# Altium PCB MezzanineDCDC_R1_test.PcbDoc (part 2 of 2)
Units mm, origin at the board's own origin, x right, y up, seen from the top; angles counter-clockwise.
Board outline 70 x 70 mm, 4 copper layers (Top Layer, GND 1, Signal, Bottom Layer), stack 1.554 mm thick; 95 components, 53 nets, 436 pads, 382 vias.
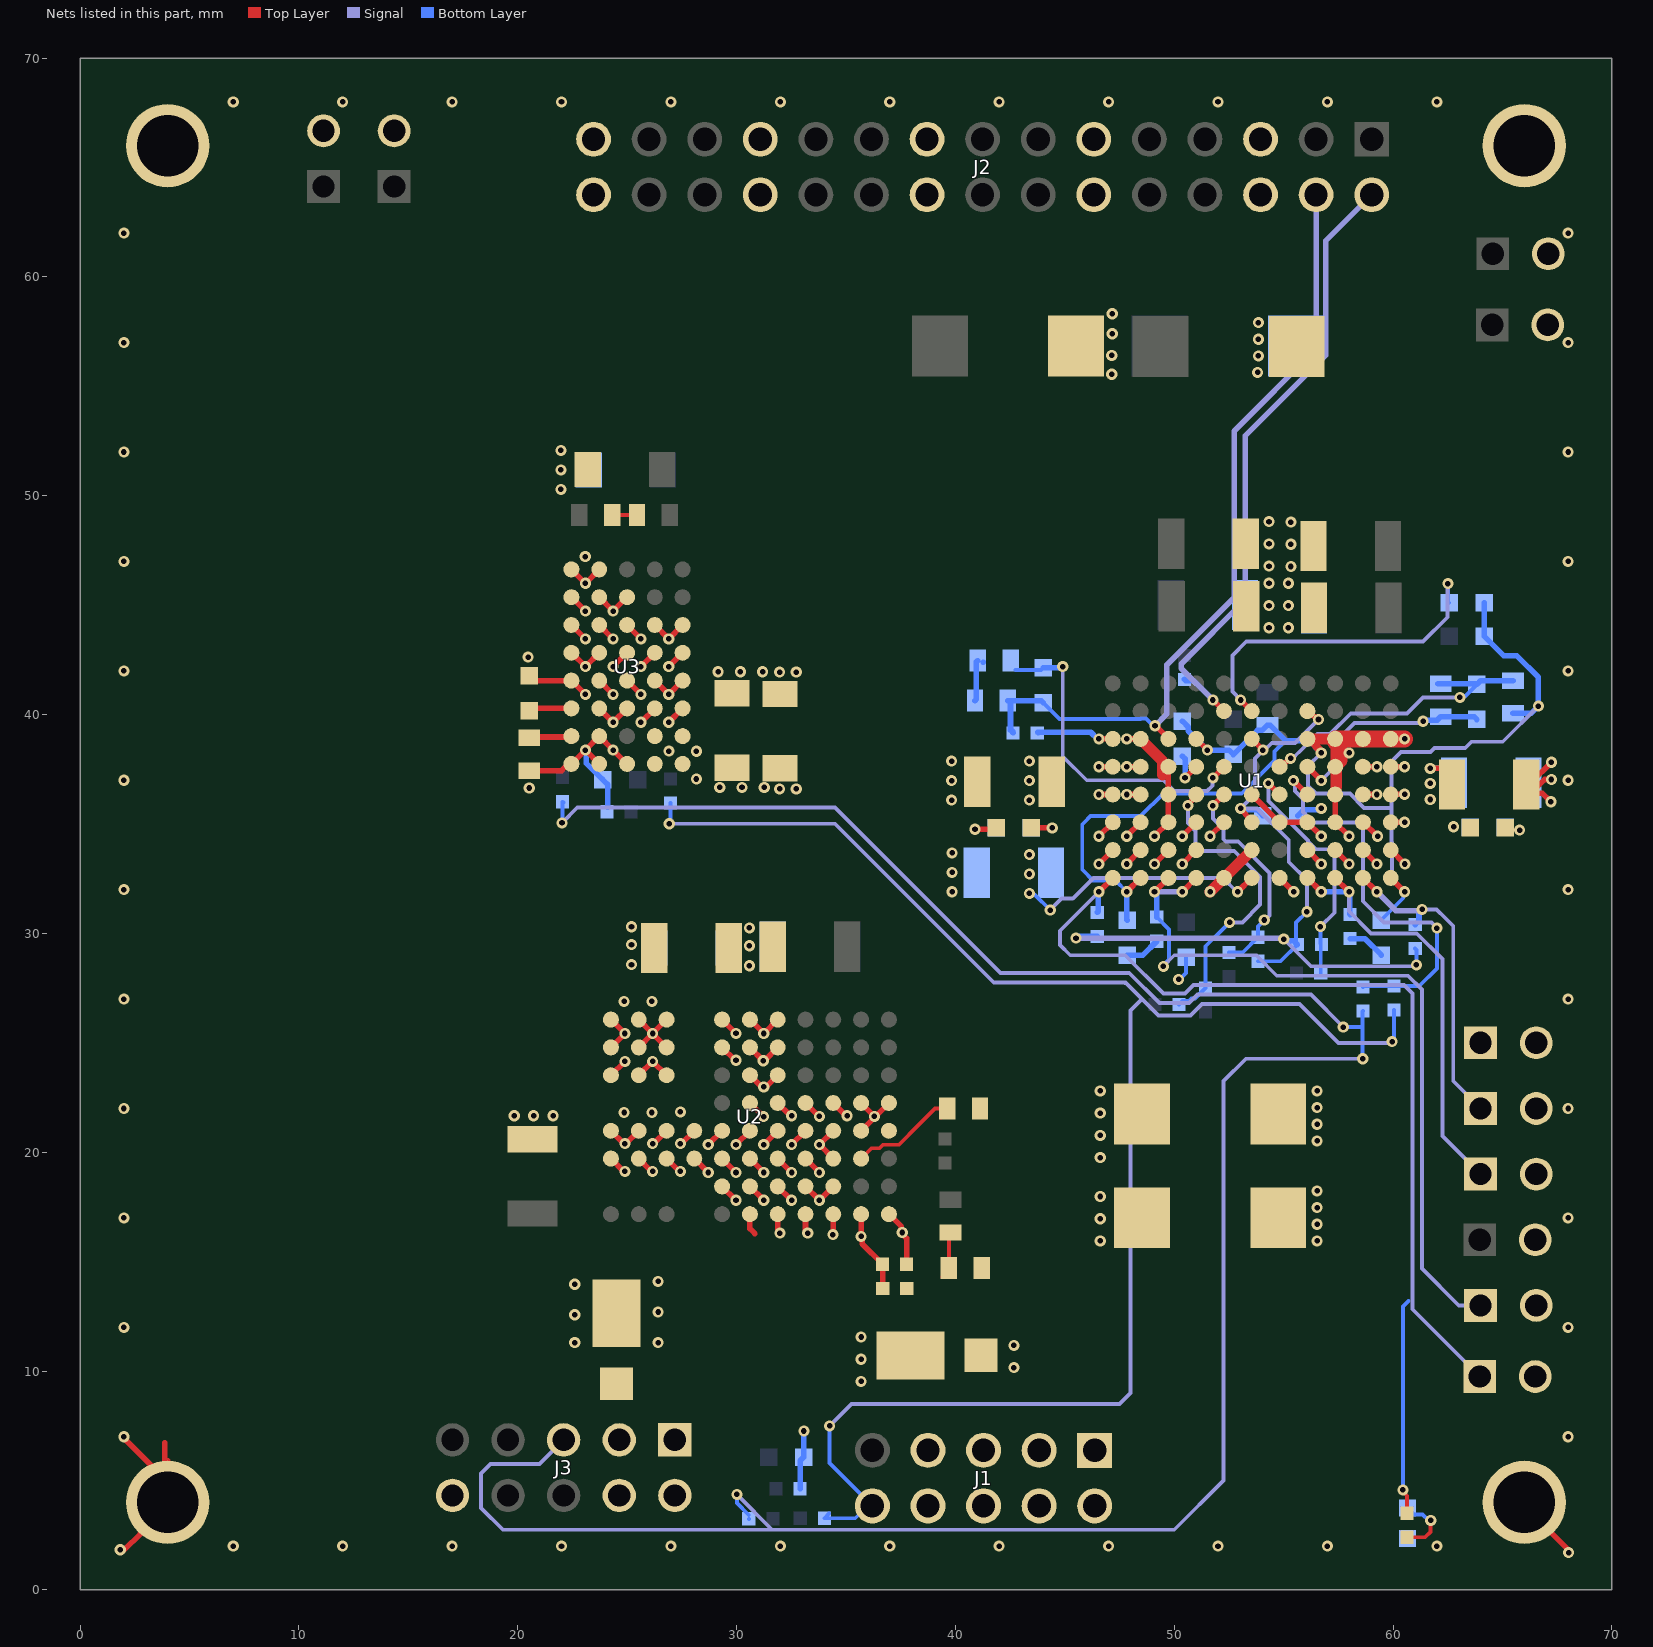
[diagram p3: the nets of this part, all layers, seen from the top]

## Via types
v1: diameter 0.508, hole 0.254, Top Layer to Bottom Layer, tented both sides, 382 vias

## Nets (pads, with @x,y where several pads share a name; then routed paths per layer and width w, separated by ;. In a path a pad name is that pad's centre, name@x,y a point inside that pad or via, vN(x,y) a via of type N, cw(c..) or ccw(c..) an arc to the next point about the centre after c; other vN are vias at no path point) (continued)
GND: C1.2 C2.2 C3.2 C4.2 C5.2 C6.2 C7.2 C8.2 C9.2 C14.2 C15.2 C20.2 C21.2 C22.2 C23.2 C24.2 C25.2 C26.2 C27.2 C28.2 C29.2 C30.2 C31.2 C32.2 C33.2 C34.2 C35.2 C36.2 C37.2 C38.2 C39.2 C40.2 C41.2 H1.2 H2.2 H3.2 H4.2 H5.2 H6.2 H7.2 H8.2 H9.2 H10.2 J1.01 J1.02 J1.07 J1.08 J2.5 J2.6 J2.11 J2.12 J2.17 J2.18 J2.23 J2.24 J2.29 J2.30 J3.1 J3.6 J3.10 L1.2 pad.1 pad.2 pad.3 pad.4 R20.1 R25.1 R26.1 R28.1 R30.1 R34.1 R35.1 U1.A3 U1.A6 U1.A7 U1.B3 U1.B6 U1.B7 U1.C3 U1.C4 U1.C5 U1.C6 U1.C7 U1.D6 U1.D7 U1.E6 U1.E8 U1.F5 U1.F7 U1.G6 U1.G8 U1.H6 U1.H7 U1.J4 U1.J5 U1.J6 U1.J7 U1.K3 U1.K6 U1.K7 U1.L3 U1.L6 U1.L7 U2.A4 U2.A5 U2.A8 U2.B4 U2.B5 U2.C4 U2.C5 U2.C6 U2.C7 U2.C8 U2.D4 U2.D5 U2.D6 U2.D7 U2.D8 U2.E1 U2.E2 U2.E3 U2.E4 U2.E5 U2.E6 U2.E7 U2.E8 U2.F1 U2.F2 U2.F3 U2.F4 U2.F5 U2.F6 U2.F7 U2.F8 U2.G1 U2.G2 U2.G5 U2.G6 U2.G7 U2.H5 U2.H6 U2.J5 U2.J6 U2.K5 U2.K6 U2.L5 U2.L6 U3.A1 U3.A2 U3.B1 U3.B2 U3.B3 U3.C1 U3.C2 U3.C3 U3.C4 U3.C5 U3.D1 U3.D2 U3.D3 U3.D4 U3.D5 U3.E1 U3.E2 U3.E3 U3.E4 U3.E5 U3.F2 U3.F3 U3.F4 U3.F5 U3.G2 U3.H1 U3.H2 U3.H3 | length 138.9
  Top Layer w0.254: v1(1.837,1.837) 2.028,1.837 2.752,2.561 ; v1(2,7) 2,6.931 pad.1@3.869,5.063 ; 3.869,6.731 pad.1@3.869,5.063 ; 4,5.905 pad.1@4,4.453 ; R35.1@20.523,37.44 22.004,37.44 22.309,37.744 U3.H1@22.454,37.744 v1(23.089,38.379) ; C38.2@20.523,41.783 20.752,41.554 U3.E1@22.454,41.554 v1(23.089,40.919) ; U3.D1@22.454,42.824 v1(23.089,42.189) U3.D2@23.724,42.824 ; U3.C1@22.454,44.094 v1(23.089,43.459) ; U3.B1@22.454,45.364 v1(23.089,44.729) ; U3.A1@22.454,46.634 v1(23.089,45.999) U3.A2@23.724,46.634 ; U3.H2@23.724,37.744 v1(23.089,38.379) ; U3.F2@23.724,40.284 v1(24.359,39.649) U3.F3@24.994,40.284 ; U3.E2@23.724,41.554 v1(24.359,40.919) ; U3.C2@23.724,44.094 v1(24.359,43.459) ; U3.B2@23.724,45.364 v1(24.359,44.729) U3.B3@24.994,45.364 ; U2.L6@24.259,19.71 24.843,19.126 v1(24.894,19.126) ; U2.L5@24.259,20.98 24.843,20.396 v1(24.894,20.396) 24.944,20.396 U2.K5@25.529,20.98 ; v1(24.359,42.189) U3.D3@24.994,42.824 ; U3.H3@24.994,37.744 v1(24.359,38.379) U3.G2@23.724,39.014 v1(23.089,38.379) ; U3.E3@24.994,41.554 v1(25.629,40.919) ; U3.C3@24.994,44.094 v1(25.629,43.459) ; U2.K6@25.529,19.71 26.113,19.126 v1(26.164,19.126) ; v1(25.629,39.649) U3.F4@26.264,40.284 ; v1(25.629,42.189) U3.D4@26.264,42.824 ; v1(26.164,20.396) 26.214,20.396 U2.J5@26.799,20.98 ; U3.E4@26.264,41.554 v1(26.899,40.919) U3.E5@27.534,41.554 ; U3.C4@26.264,44.094 v1(26.899,43.459) U3.C5@27.534,44.094 ; U2.J6@26.799,19.71 27.383,19.126 v1(27.434,19.126) ; v1(26.899,39.649) U3.F5@27.534,40.284 ; v1(26.899,42.189) U3.D5@27.534,42.824 ; v1(27.434,20.396) 27.484,20.396 U2.H5@28.069,20.98 ; U2.H6@28.069,19.71 v1(28.704,19.075) ; v1(28.704,20.345) U2.G5@29.339,20.98 ; U2.G7@29.339,18.44 v1(29.974,17.805) ; U2.G6@29.339,19.71 v1(29.974,19.075) ; U2.G2@29.339,24.79 29.923,24.206 v1(29.974,24.206) ; U2.G1@29.339,26.06 29.969,25.43 v1(29.974,25.43) ; v1(29.974,20.345) U2.F5@30.609,20.98 ; U2.F8@30.609,17.17 30.609,16.51 30.837,16.281 ; U2.F7@30.609,18.44 v1(31.244,17.805) ; U2.F6@30.609,19.71 v1(31.244,19.075) ; U2.F4@30.609,22.25 31.23,21.629 v1(31.233,21.629) ; U2.F3@30.609,23.52 31.103,23.026 31.384,23.026 U2.E3@31.879,23.52 ; U2.F2@30.609,24.79 v1(31.218,24.181) 31.269,24.181 U2.E2@31.879,24.79 ; U2.F1@30.609,26.06 v1(31.244,25.425) U2.E1@31.879,26.06 ; v1(31.244,20.345) U2.E5@31.879,20.98 ; U2.E8@31.879,17.17 31.879,16.463 31.98,16.362 v1(31.98,16.307) ; U2.E7@31.879,18.44 v1(32.514,17.805) ; U2.E6@31.879,19.71 v1(32.514,19.075) ; U2.E4@31.879,22.25 32.463,21.666 v1(32.514,21.666) ; v1(32.514,20.345) U2.D5@33.149,20.98 ; U2.D8@33.149,17.17 33.149,16.463 33.25,16.362 v1(33.25,16.307) ; U2.D7@33.149,18.44 v1(33.784,17.805) U2.C7@34.419,18.44 ; U2.D6@33.149,19.71 v1(33.784,19.075) ; U2.D4@33.149,22.25 33.758,21.641 v1(33.784,21.641) ; v1(34.403,16.236) 34.411,16.244 34.411,17.163 U2.C8@34.419,17.17 ; U2.C6@34.419,19.71 v1(33.784,20.345) U2.C5@34.419,20.98 ; U2.C4@34.419,22.25 35.003,21.666 v1(35.054,21.666) ; U2.B5@35.689,20.98 36.298,21.59 v1(36.298,21.641) ; U2.B4@35.689,22.25 v1(36.298,21.641) ; U2.A8@36.959,17.17 37.529,16.6 37.529,16.371 v1(37.568,16.332) 37.568,16.263 37.77,16.062 R30.1@37.77,14.884 ; U2.A4@36.959,22.25 36.349,21.641 v1(36.298,21.641) ; v1(40.894,34.76) 41.796,34.76 C8.2@41.859,34.823 ; v1(46.558,33.172) U1.L7@47.193,33.807 ; v1(46.558,34.442) U1.L6@47.193,35.077 ; v1(46.558,38.887) U1.L3@47.193,38.887 ; v1(47.828,33.172) U1.K7@48.463,33.807 ; v1(47.828,34.442) U1.K6@48.463,35.077 ; v1(47.828,38.887) U1.K3@48.463,38.887 ; v1(49.098,33.172) U1.J7@49.733,33.807 ; v1(49.098,34.442) U1.J6@49.733,35.077 U1.J5@49.733,36.347 49.733,37.236 ; v1(50.368,33.172) U1.H7@51.003,33.807 ; v1(50.368,34.442) U1.H6@51.003,35.077 ; v1(51.638,34.442) U1.G6@52.273,35.077 ; U1.F5@53.543,36.347 U1.E6@54.813,35.077 U1.D6@56.083,35.077 v1(56.718,34.442) ; U1.E8@54.813,32.537 54.82,32.537 55.455,31.902 v1(55.461,31.902) ; U1.D7@56.083,33.807 v1(56.718,33.172) ; U1.C7@57.353,33.807 v1(57.988,33.172) ; U1.C5@57.353,36.347 U1.C6@57.353,35.077 v1(57.988,34.442) ; U1.C4@57.571,37.836 v1(57.988,38.252) ; U1.B7@58.623,33.807 v1(59.258,33.172) ; U1.B6@58.623,35.077 58.642,35.077 59.277,34.442 v1(59.296,34.442) ; U1.A7@59.893,33.807 59.9,33.807 60.535,33.172 v1(60.541,33.172) ; U1.A6@59.893,35.077 v1(60.528,35.077) ; pad.4@65.655,4.195 68.019,1.831 v1(68.019,1.702) ; v1(67.208,36.017) 66.815,36.411 C2.2@66.307,36.411 ; v1(67.234,37.033) 66.929,37.033 C2.2@66.307,36.411 ; v1(67.234,37.821) 66.307,36.893 C2.2@66.307,36.411 ; 2.752,2.561 4,3.809 pad.1@4,4.131 ; 2.752,2.561 pad.1@4.322,4.131 ; pad.1@3.869,4.584 pad.1@3.869,5.063 ; pad.1@3.869,4.584 pad.1@4,4.453 ; pad.1@3.869,4.584 3.869,4.262 pad.1@4,4.131 ; pad.1@4,4.131 pad.1@4.322,4.131 ; pad.1@4,4.131 pad.1@4,4.453 ; pad.1@4,4.453 pad.1@4.322,4.131
  Top Layer w0.508: U1.K3@48.463,38.887 49.468,37.882 49.468,37.236 ; v1(51.638,31.902) U1.G8@52.273,32.537 U1.F7@53.543,33.807 ; U1.C5@57.353,36.347 57.396,36.39 57.396,36.69 57.404,36.698 57.404,37.617 57.404,37.789 U1.C4@57.511,37.896
  Top Layer w0.762: U1.C4@57.531,37.916 57.531,38.589 57.353,38.767 U1.C3@57.353,38.887 U1.B3@58.623,38.887 U1.A3@59.893,38.887 v1(60.528,38.887)
  Signal w0.254: pad.4@65.75,4.25 pad.4@66,4
  Bottom Layer w0.178: v1@50.19,27.838 50.546,28.194 C15.2@50.546,28.905
  Bottom Layer w0.254: v1(23.089,38.379) 23.127,38.341 23.127,37.782 C37.2@23.876,37.033 24.105,36.805 R34.1@24.105,35.763 ; R25.1@32.901,4.623 32.901,5.901 C33.2@33.071,6.071 v1@33.071,7.264 ; R20.1@43.783,39.173 43.764,39.192 46.185,39.192 46.489,38.887 v1(46.558,38.887) ; v1@51.59,31.854 v1(51.638,31.902) ; v1(51.638,34.442) v1@51.707,34.442 ; C14.2@55.651,35.382 55.924,35.655 56.592,35.655 56.649,35.712 v1(56.718,35.712)
  other v1: 7,2 12,2 17,2 22,2 27,2 32,2 37,2 42,2 47,2 52,2 57,2 62,2 68,7 33.073,7.262 2,12 68,12 56.527,15.946 56.527,16.708 2,17 68,17 56.527,17.47 56.527,18.232 56.527,20.518 56.527,21.28 19.839,21.666 20.728,21.666 21.617,21.666 24.86,21.816 26.13,21.816 27.432,21.844 2,22 68,22 56.527,22.042 56.527,22.804 31.244,22.987 2,27 68,27 50.202,27.895 30.583,28.524 30.583,29.439 30.583,30.251 39.853,31.902 2,32 68,32 39.853,32.791 39.853,33.68 65.786,34.722 39.827,36.093 20.527,36.645 39.827,36.982 2,37 68,37 39.827,37.871 31.964,41.94 32.726,41.94 29.156,41.956 30.172,41.956 31.188,41.956 2,42 68,42 20.474,42.63 54.331,43.967 55.22,43.967 54.331,44.983 55.22,44.983 54.331,45.999 55.22,45.999 55.332,46.766 54.331,46.787 2,47 68,47 23.082,47.216 55.332,47.782 54.331,47.803 55.332,48.798 54.331,48.819 21.971,50.292 21.971,51.181 2,52 68,52 21.971,52.07 47.142,55.55 53.813,55.634 53.848,56.388 47.142,56.413 2,57 68,57 53.848,57.15 47.168,57.404 53.848,57.912 47.168,58.318 2,62 68,62 7,68 12,68 17,68 22,68 27,68 32,68 37,68 42,68 47,68 52,68 57,68 62,68
INTVCC: C14.1 R9.2 R10.2 R11.2 R13.2 U1.D2 U1.F3 U1.F6 | length 38.4
  Top Layer w0.254: v1(53.035,35.712) U1.F6@53.543,35.077 ; U1.F3@53.543,38.887 v1(54.051,38.379) ; U1.D2@56.083,40.157 v1(56.591,39.776)
  Signal w0.178: v1(55.002,29.742) 56.245,28.499 v1@61.062,28.499 ; v1@56.058,31 56.058,32.442 55.233,33.267 55.233,34.267 53.788,35.712 v1(53.035,35.712) 53.698,36.375 53.698,36.523 53.696,36.525 53.696,37.999 54.051,38.354 v1(54.051,38.379) 54.127,38.379 54.457,38.71 55.524,38.71 v1(56.591,39.776)
  Signal w0.254: v1(45.51,29.788) v1@55.108,29.788
  Bottom Layer w0.178: R11.2@53.823,28.727 54.864,28.727 R13.2@55.626,29.489 ; R13.2@55.559,29.556 55.559,30.492 v1(56.06,30.992) ; R10.2@61.011,29.304 61.064,29.251 v1(61.064,28.561)
  Bottom Layer w0.254: v1@45.491,29.769 v1(45.51,29.788) 45.585,29.863 R9.2@46.482,29.863 ; v1(53.035,35.712) 53.104,35.712 53.161,35.655 53.778,35.655 C14.1@54.051,35.382 ; v1(55.002,29.742) 55.071,29.742 55.15,29.662 55.453,29.662 55.559,29.556 R13.2@55.626,29.489
MEZZ_EN: J1.10 R3.2 R23.2 R32.2 | length 80
  Signal w0.178: v1(26.923,35.01) 34.49,35.01 41.75,27.75 47.779,27.75 ; v1(34.252,7.492) 35.259,8.5 47.5,8.5 48,9 48,26.471 48.529,27 ; 47.75,27.721 47.779,27.75 ; v1(59.959,25.058) 59.901,25 57.5,25 55.728,26.772 51.272,26.772 50.75,26.25 49.279,26.25 48.529,27 ; 47.779,27.75 48.529,27
  Bottom Layer w0.178: v1@26.924,35.001 26.975,35.052 R32.2@26.975,35.959 R32.2@26.983,35.951 ; R23.2@34.222,3.488 R23.2@34.011,3.277 35.423,3.277 35.985,3.839 J1.10@36.207,3.839 34.25,5.795 v1@34.25,7.5 ; v1@60,25 60.046,25.046 R3.2@60.046,26.492
MEZZ_EN_SPARE: J3.3 R4.2 R24.2 R33.2 | length 114.4
  Signal w0.178: v1(22.022,35.052) 22.72,35.75 34.5,35.75 42.055,28.195 47.945,28.195 49.321,26.818 50.679,26.818 51.064,27.203 56.25,27.203 57.722,25.731 v1(57.722,25.719) ; J3.3@22.098,6.858 20.99,5.75 18.75,5.75 18.324,5.324 18.324,3.75 19.324,2.75 31.624,2.75 ; v1(30.01,4.363) 31.624,2.75 ; v1(58.613,24.271) 53.271,24.271 52.25,23.25 52.25,5 50,2.75 31.624,2.75
  Bottom Layer w0.178: v1(22.022,35.052) 22.047,35.077 R33.2@22.047,36.017 R33.2@22.088,35.976 ; v1@30.023,4.369 30.023,3.962 R24.2@30.556,3.429 ; R24.2@30.556,3.251 R24.2@30.564,3.243 ; v1(57.722,25.719) 58.544,25.719 58.598,25.773 ; v1@57.75,25.75 v1@57.773,25.773 ; v1@58.5,24.25 58.598,24.348 58.598,25.773 ; R4.2@58.623,26.459 58.598,26.434 58.598,25.773
NetC16_1: C16.1 R15.1 | length 1.6
  Bottom Layer w0.254: C16.1@47.854,29.007 48.565,29.007 R15.1@49.2,29.642
NetC17_1: C17.1 R16.1 | length 1.7
  Bottom Layer w0.254: R16.1@58.039,29.761 58.707,29.761 C17.1@59.461,29.007
NetD2_2: D2.2 J1.03 J1.04 J1.05 J1.06
  other v1: 42.672,10.16 42.672,11.176
NetD3_2: D3.2 J3.2 J3.7
NetL1_1: L1.1 R38.2 | length 3
  Top Layer w0.178: R38.2@60.63,2.405 61.46,2.405 61.709,2.654 61.709,3.162 v1(61.722,3.175)
  Bottom Layer w0.178: L1.1@60.655,3.746 60.947,3.454 61.353,3.454 61.633,3.175 v1(61.722,3.175)
NetR5_1: R5.1 R6.2 | length 1.9
  Bottom Layer w0.254: R6.2@40.894,40.64 40.957,40.703 40.957,42.405 R5.1@41.021,42.469
NetR27_1: R27.1 R28.2 | length 2.4
  Top Layer w0.178: R28.2@39.414,14.295 39.7,14.582 R28.2@39.7,14.707 39.7,16.13 39.903,16.332 R27.1@39.778,16.332
NetR36_1: R36.1 R37.2 | length 1.1
  Top Layer w0.178: R36.1@24.309,49.124 R37.2@25.451,49.124
PGOOD1: R11.1 R12.2 U1.G5 | length 10
  Top Layer w0.254: v1(51.765,35.839) U1.G5@52.273,36.347
  Signal w0.178: v1(51.765,35.839) 51.765,35.242 52.25,34.758 52.25,34.305 52.354,34.201 52.923,34.201 54.356,32.768 54.356,30.81 v1@54.102,30.556
  Bottom Layer w0.178: R12.2@52.502,29.134 53.129,29.134 R11.1@53.823,29.827 53.823,30.322 v1(54.114,30.613)
PGOOD2: R13.1 R14.2 U1.E5 | length 11.3
  Top Layer w0.254: v1(54.305,36.855) U1.E5@54.813,36.347
  Signal w0.178: v1(54.305,36.855) 54.305,36.055 56.11,34.25 56.11,34.206 56.471,33.846 57.146,33.846 57.315,33.676 57.315,30.944 v1(56.679,30.308)
  Bottom Layer w0.178: v1(56.679,30.308) 56.679,29.536 56.693,29.523 R14.2@56.693,28.194
RT: R26.2 U2.B6 | length 5.4
  Top Layer w0.178: U2.B6@35.689,19.71 36.159,20.18 36.535,20.18 36.697,20.342 37.415,20.342 37.897,20.824 37.897,20.828 39.065,21.996 R26.2@39.624,21.996 39.624,21.871 R26.2@39.338,21.585
RT_1: R35.2 U3.G1 | length 2
  Top Layer w0.254: R35.2@20.523,38.94 20.561,38.977 22.416,38.977 U3.G1@22.454,39.014
RUN1: R1.1 R2.1 U1.H5 | length 14.1
  Top Layer w0.254: v1(50.622,35.839) U1.H5@51.003,36.347
  Signal w0.178: v1(50.622,35.839) 50.622,35.033 50.968,34.687 50.968,34.032 51.237,33.763 51.384,33.763 51.391,33.769 52.744,33.769 53.924,32.589 53.924,31.318 53.111,30.505 v1(52.527,30.505)
  Bottom Layer w0.178: R1.1@50.216,26.746 50.374,26.904 50.678,26.904 50.795,27.02 50.947,27.02 R2.1@51.435,27.508 51.435,29.413 v1(52.527,30.505)
RUN2: R3.1 R4.1 U1.D5 | length 18.4
  Top Layer w0.254: v1(55.448,36.982) U1.D5@56.083,36.347
  Signal w0.178: v1(55.448,36.982) 55.511,36.919 55.511,36.509 55.891,36.129 55.891,35.549 56.363,35.077 58.395,35.077 58.623,34.849 58.623,31.471 59.594,30.5 61.079,30.5 61.08,30.499 61.751,30.499 v1@62,30.25
  Bottom Layer w0.178: R4.1@58.623,27.559 58.656,27.592 R3.1@60.046,27.592 61.197,27.592 62.002,28.397 v1(62.002,30.242)
S_GND: C12.2 C13.2 C16.2 C17.2 C18.2 C19.2 R8.1 R17.1 U1.A8 U1.D3 U1.H3 U1.K8 | length 58.4
  Top Layer w0.254: v1(47.828,31.902) U1.K8@48.463,32.537 ; U1.H3@51.003,38.887 v1(51.511,38.379) ; v1@56.673,38.427 56.212,38.887 U1.D3@56.083,38.887 v1(56.718,38.252) ; U1.A8@59.893,32.537 v1(60.528,31.902)
  Signal w0.178: v1(56.718,38.252) 56.109,37.643 56.109,36.748 56.471,36.386 58.026,36.386 58.674,35.738 59.931,35.738 ; v1@60.528,31.928 v1(60.528,31.902) 59.944,32.487 59.944,34.156 59.931,34.169 59.931,35.738 ; v1(66.637,40.386) 65.011,38.76 63.576,38.76 63.297,38.481 61.9,38.481 61.709,38.291 60.357,38.291 59.931,37.865 59.931,35.738
  Bottom Layer w0.178: v1(47.828,31.902) 47.307,32.423 46.291,32.423 45.796,32.918 45.796,34.976 45.885,35.065 45.885,35.067 46.175,35.357 48.463,35.357 49.505,36.398 53.086,36.398 54.585,37.897 54.585,38.305 55.091,38.811 ; C17.2@59.461,30.607 60.465,31.61 60.465,31.839 v1(60.528,31.902)
  Bottom Layer w0.254: v1(47.828,31.902) 47.828,30.632 C16.2@47.854,30.607 ; C12.2@50.368,39.7 50.641,39.427 50.641,39.249 v1(51.511,38.379) 52.502,38.379 C18.2@52.705,38.176 53.803,39.274 54.006,39.274 R17.1@54.254,39.522 54.379,39.522 55.091,38.811 56.159,38.811 v1(56.718,38.252) ; C13.2@64.16,45.11 C19.2@64.16,43.586 65.062,42.685 65.657,42.685 66.637,41.705 v1(66.637,40.386) 66.305,40.054 R8.1@65.481,40.054
Sense+_0v9: J2.2 R19.2 U1.G2 | length 29.7
  Top Layer w0.254: v1(51.765,40.665) U1.G2@52.273,40.157
  Signal w0.254: v1(51.765,40.665) 50.321,42.11 50.321,42.321 53.25,45.25 53.25,52.75 56.914,56.414 56.914,61.644 J2.2@59.023,63.752
  Bottom Layer w0.254: R19.2@50.47,41.605 50.521,41.554 50.876,41.554 v1(51.765,40.665)
Sense-_0v9: C10.2 J2.4 R6.1 R20.2 U1.J3 | length 36.8
  Top Layer w0.254: v1@49.276,39.37 49.733,38.913 U1.J3@49.733,38.887
  Signal w0.254: v1(49.121,39.487) 49.657,40.024 49.657,42.268 52.742,45.353 52.742,52.96 56.483,56.701 J2.4@56.483,63.752
  Bottom Layer w0.178: C10.2@44.018,40.538 44.755,39.802 48.468,39.802 48.483,39.817 48.714,39.817 49.043,39.487 v1(49.121,39.487)
  Bottom Layer w0.254: R20.2@42.594,39.218 R20.2@42.617,39.24 ; R20.2@42.639,39.167 42.516,39.289 42.516,40.518 R6.1@42.394,40.64 43.917,40.64 C10.2@44.018,40.538
SS: C38.1 U3.F1 | length 2
  Top Layer w0.254: C38.1@20.523,40.183 20.625,40.284 U3.F1@22.454,40.284
SW1: H5.1 R15.2 U1.H8 U1.J8 | length 35.7
  Top Layer w0.254: v1(49.098,31.902) U1.J8@49.733,32.537 ; v1(50.368,31.902) U1.H8@51.003,32.537
  Signal w0.178: v1@49.5,28.5 50,29 53.75,29 54.683,28.067 60.683,28.067 61.318,27.432 61.318,14.682 63,13 H5.1@64,13
  Signal w0.254: v1(49.098,31.902) v1(50.368,31.902)
  Bottom Layer w0.178: R15.2@49.2,30.742 49.766,30.175 49.766,28.811 49.502,28.547 v1(49.502,28.492)
  Bottom Layer w0.254: v1(49.098,31.902) 49.098,31.834 49.2,31.732 R15.2@49.2,30.742
SW2: H7.1 R16.2 U1.C8 U1.D8 | length 20.7
  Top Layer w0.254: U1.D8@56.083,32.537 v1(56.718,31.902) ; U1.C8@57.353,32.537 v1(57.988,31.902)
  Signal w0.178: v1(57.988,31.902) 57.988,31.012 59,30 61.08,30 62.25,28.83 62.25,20.75 H7.1@64,19
  Bottom Layer w0.254: v1(56.718,31.902) v1(57.988,31.902) 58.014,31.877 58.014,30.886 R16.2@58.039,30.861
SYNC: R29.1 R30.2 U2.B8 | length 3.9
  Top Layer w0.254: U2.B8@35.689,17.17 35.689,16.154 v1@35.714,16.129 ; v1(35.692,16.151) 35.741,16.103 35.741,15.813 R30.2@36.67,14.884 36.674,14.881 36.674,13.771 R29.1@36.678,13.767
  Bottom Layer w0.254: v1@35.692,16.096 v1(35.692,16.151)
TEMP1+: H4.1 R9.1 U1.L8 | length 41.2
  Top Layer w0.254: v1(46.558,31.902) U1.L8@47.193,32.537
  Signal w0.178: v1(46.558,31.902) 44.777,30.121 44.777,29.473 45.25,29 47.75,29 49.5,27.25 50.5,27.25 50.885,27.635 60.504,27.635 60.886,27.253 60.886,12.824 H4.1@63.96,9.75
  Bottom Layer w0.254: R9.1@46.482,30.963 46.52,31.001 46.52,31.864 v1(46.558,31.902)
TEMP2+: H6.1 R10.1 U1.B8 | length 14.7
  Top Layer w0.254: U1.B8@58.623,32.537 v1(59.258,31.902)
  Signal w0.178: v1(61.328,31.096) 61.992,31.096 62.419,30.669 62.75,30.338 62.75,23.25 H6.1@64,22
  Signal w0.254: v1(59.258,31.902) 60.122,31.039 v1@61.316,31.039
  Bottom Layer w0.254: R10.1@61.011,30.404 61.184,30.577 61.184,30.883 61.328,31.027 v1(61.328,31.096)
TRACK1: C12.1 U1.H4 | length 1.8
  Top Layer w0.254: v1(50.491,37.105) U1.H4@51.003,37.617
  Bottom Layer w0.254: C12.1@50.368,38.1 50.495,37.973 50.495,37.109 v1(50.491,37.105)
TRACK2: C13.1 U1.F2 | length 16
  Top Layer w0.254: v1(53.035,40.665) U1.F2@53.543,40.157
  Signal w0.178: v1(53.035,40.665) 52.654,41.046 52.654,42.697 53.289,43.332 61.366,43.332 62.484,44.45 v1@62.484,46.025
  Bottom Layer w0.178: v1(62.501,45.987) 62.501,45.169 C13.1@62.56,45.11
  Bottom Layer w0.254: v1@52.987,40.714 v1(53.035,40.665)
VFB1: C10.1 R5.2 U1.G4 | length 15
  Top Layer w0.254: v1(51.765,37.109) U1.G4@52.273,37.617
  Signal w0.178: v1(44.907,42.189) 44.907,38.093 46,37 49.5,37 50,36.5 51.5,36.5 51.75,36.75 51.75,37.094 v1(51.765,37.109)
  Bottom Layer w0.178: R5.2@42.748,42.037 43.917,42.037 C10.1@44.018,42.138
  Bottom Layer w0.254: C10.1@44.018,42.138 44.856,42.138 v1(44.907,42.189)
VFB2: C11.1 R7.2 R8.2 U1.E4 | length 14.1
  Top Layer w0.254: U1.E4@54.813,37.617 v1(55.321,37.998)
  Signal w0.178: v1(55.321,37.998) 55.411,37.998 55.69,38.278 55.703,38.278 56.541,39.116 57.125,39.116 58.064,40.056 60.636,40.056 61.367,40.787 v1(63.055,40.787)
  Bottom Layer w0.178: v1(63.055,40.787) 63.118,40.85 63.304,40.85 C11.1@63.83,41.376
  Bottom Layer w0.254: R7.2@62.054,41.403 R7.2@62.179,41.403 63.803,41.403 C11.1@63.83,41.376 64.008,41.554 R8.2@65.481,41.554
VIN: C1.1 C2.1 C3.1 C4.1 C5.1 C6.1 C7.1 C8.1 C9.1 C29.1 C30.1 C35.1 C36.1 C41.1 D2.1 D3.1 H3.1 R29.2 R38.1 U1.A4 U1.A5 U1.B4 U1.B5 U1.F8 U1.K4 U1.K5 U1.L4 U1.L5 U2.J1 U2.J2 U2.J3 U2.K1 U2.K2 U2.K3 U2.L1 U2.L2 U2.L3 U3.G4 U3.G5 U3.H4 U3.H5 | length 38.3
  Top Layer w0.178: v1(60.452,4.572) 60.452,4.483 60.63,4.305 R38.1@60.63,3.505
  Top Layer w0.254: U2.L3@24.259,23.52 v1(24.894,24.155) ; U2.L2@24.259,24.79 v1(24.894,25.425) U2.L1@24.259,26.06 ; U2.K3@25.529,23.52 v1(26.164,24.155) U2.J3@26.799,23.52 ; U2.K2@25.529,24.79 v1(26.164,25.425) ; U2.K1@25.529,26.06 v1(26.164,25.425) ; U2.J2@26.799,24.79 v1(26.164,25.425) ; U2.J1@26.799,26.06 v1(26.164,25.425) ; C8.1@43.459,34.823 v1(44.425,34.823) ; v1(46.558,36.347) U1.L5@47.193,36.347 ; v1(46.558,37.617) U1.L4@47.193,37.617 ; v1(47.828,36.347) U1.K5@48.463,36.347 ; v1(47.828,37.617) U1.K4@48.463,37.617 ; v1(52.895,31.902) 52.902,31.902 53.537,32.537 U1.F8@53.543,32.537 ; U1.B5@58.623,36.347 v1(59.258,36.347) ; U1.B4@58.623,37.617 v1(59.258,37.617) ; U1.A5@59.893,36.347 59.9,36.354 60.522,36.354 v1(60.528,36.36) ; U1.A4@59.893,37.617 v1(60.528,37.617) ; v1(61.697,37.541) 62.151,37.541 62.624,37.068 C2.1@62.624,36.982
  Signal w0.178: v1@44.323,31.064 44.856,31.598 45.364,31.598 46.304,32.537 52.222,32.537 52.857,31.902 v1(52.895,31.902)
  Bottom Layer w0.178: v1(43.383,31.826) 43.446,31.763 43.636,31.763 v1(44.334,31.064) ; v1(60.452,4.572) 60.452,12.954 60.706,13.208
  Bottom Layer w0.254: v1(61.697,37.541) 62.519,37.541 62.767,37.293 C4.1@62.767,37.008
  other v1: 35.687,9.525 35.687,10.541 22.606,11.303 26.416,11.303 35.687,11.557 22.606,12.573 26.416,12.7 22.606,13.97 26.416,14.097 46.621,15.946 46.621,16.962 46.621,17.978 46.621,19.756 46.621,20.772 46.621,21.788 46.621,22.804 24.86,26.896 26.13,26.896 25.198,28.575 25.198,29.489 25.198,30.302 43.383,32.715 43.383,33.604 62.763,34.874 43.383,36.093 61.697,36.119 31.964,36.606 32.726,36.606 29.232,36.672 30.248,36.672 31.264,36.672 61.697,36.855 43.383,36.982 28.162,37.056 43.383,37.871 26.907,38.331 28.162,38.326
VOUTS2-: C11.2 R7.1 U1.D4 | length 9.9
  Top Layer w0.254: U1.D4@56.083,37.617 v1(56.718,36.982)
  Signal w0.178: v1(56.718,36.982) 57.328,37.592 57.328,38.709 58.243,39.624 v1@61.371,39.624
  Bottom Layer w0.254: v1(61.371,39.696) 61.42,39.744 62.02,39.744 R7.1@62.179,39.903 63.703,39.903 C11.2@63.83,39.776
pads on no net: J2.1 J2.3 U1.E7 U1.H2 U2.A6
copper on no net: | length 2.7
  Top Layer w0.254: 37.05,19.801 36.959,19.71 37.472,19.71 37.49,19.71 37.592,19.812 v1(37.846,19.812) v1@37.621,19.812 ; v1(50.495,40.665) 51.003,40.157 ; v1(54.305,34.315) 54.813,33.807

## Polygon pours and split planes (outlines as drawn)
0.9V on Top Layer "0.9V_L01_P007" (solid, remove dead copper, pour order 7): 47.625,57.658 47.625,54.356 43.942,50.673 41.91,49.911 41.91,41.148 41.91,40.005 52.07,40.005 52.197,40.005 52.197,57.658
GND on Top Layer "GND_L01_P010" (solid, remove dead copper, pour order 10): 27.713,18.618 27.713,14.378 27.686,14.351 29.464,12.573 42.418,12.573 43.307,13.462 43.307,48.768 47.879,53.34 47.879,67.183 45.466,67.183 44.831,66.548 44.831,61.722 43.815,61.722 42.03,59.937 42.03,52.317 40.005,50.292 40.005,39.37 38.889,38.443 38.889,23.739 38.04,22.555 26.873,22.555 26.797,22.479 26.797,18.669 26.848,18.618
+3.8V on Top Layer "+3.8V_L01_P018" (solid, remove dead copper, pour order 18): 30.988,44.399 33.654,44.399 33.654,34.561 32.285,34.561 32.285,30.937 32.678,30.937 38.889,23.739 38.889,38.443 39.078,38.443 40.029,39.394 40.029,49.269 36.204,53.094 36.204,61.039 37.353,62.188 37.353,62.706 30.988,62.706
-3.8V on Top Layer "-3.8V_L01_P022" (solid, remove dead copper, pour order 22): 25.425,49.936 25.4,49.911 24.257,49.911 24.257,52.578 21.336,52.578 21.336,62.499 24.78,62.499 24.78,67.429 29.718,67.429 29.718,62.738 30.117,62.339 30.117,54.15 30.02,54.15 30.117,53.086 30.117,49.911 28.702,49.911 24.257,49.911
GND on Top Layer "GND_L01_P052" (solid, remove dead copper, pour order 52): 1.27,68.58 68.326,68.58 68.453,68.707 68.453,1.143 1.27,1.143
GND on Top Layer "GND_L01_P017" (solid, remove dead copper, pour order 17): 39.47,62.804 39.813,62.461 39.813,61.882 39.657,61.882 37.209,59.434 37.209,53.213 41.783,53.213 42.442,53.212 42.442,51.976 42.403,51.976 40.441,50.015 40.441,48.681 36.204,53.094 36.204,60.978 38.03,62.804
VIN on Top Layer "VIN_L01_P009" (solid, remove dead copper, pour order 9): 27.586,30.937 27.559,30.964 27.559,33.528 30.099,36.068 32.893,36.068 32.893,39.497 26.162,39.497 25.781,39.116 25.781,36.703 12.065,36.703 11.684,36.163 11.684,29.591 27.559,29.591 27.559,32.004
2.2V on Top Layer "2.2V_L01_P051" (solid, remove dead copper, pour order 51): 57.277,42.545 54.356,42.545 54.356,39.624 65.913,39.624 65.913,42.545 56.832,42.545 56.812,42.565
2.2V on Top Layer "2.2V_L01_P049" (solid, remove dead copper, pour order 49): 57.607,50.317 57.607,53.924 57.658,53.975 57.658,54.61 58.293,54.61 58.293,62.484 65.913,62.484 65.913,40.132 57.693,40.132 57.531,40.294 57.531,50.394
GND on Top Layer "GND_L01_P050" (solid, remove dead copper, pour order 50): 58.547,67.31 58.547,42.214 58.496,42.163 58.496,42.164 52.07,42.164 52.07,67.183 52.197,67.31
GND on Top Layer "GND_L01_P021" (solid, remove dead copper, pour order 21): 30.862,43.895 30.862,62.928 30.122,62.928 30.117,54.15 30.117,43.871 31.623,43.871 31.072,44.021
+3.8V on Top Layer "+3.8V_L01_P019" (solid, remove dead copper, pour order 19): 38.63,24.221 38.63,23.097 37.983,22.45 32.391,22.45 32.285,22.555 32.285,31.531 32.235,31.581 38.649,31.581
GND on Top Layer "GND_L01_P012" (solid, remove dead copper, pour order 12): 27.948,30.504 27.948,33.564 30.191,35.808 32.951,35.808 32.975,35.784 32.987,35.796 33.107,35.796 33.107,40.103 33.095,40.115 32.231,40.115 32.147,40.199 32.303,40.355 32.303,44.399 33.654,44.399 33.654,34.561 31.186,34.561 32.303,34.561 32.303,30.937 31.031,30.852 30.611,30.852 31.031,30.852
0.9V on Top Layer "0.9V_L01_P004" (solid, remove dead copper, pour order 4): 47.625,67.31 47.625,54.399 47.68,54.344 52.578,54.344 52.578,62.484 52.578,67.31
VIN on Top Layer "VIN_L01_P001" (solid, remove dead copper, pour order 1): 51.837,31.115 60.96,31.115 60.979,31.096 61.449,31.096 61.595,31.242 61.544,31.293 61.544,31.826 61.595,31.877 61.595,32.385 64.008,32.385 64.008,27.051 65.151,25.908 65.151,23.749 65.024,23.622 61.849,23.622 61.087,24.384 51.816,24.384 51.816,30.95 51.778,30.988
VIN on Top Layer "VIN_L01_P000" (solid, remove dead copper, pour order 0): 42.545,30.632 42.037,30.124 42.037,22.352 42.418,21.971 52.578,21.971 52.578,30.988 52.451,31.115 42.545,31.115
+3.8V on Bottom Layer "NONET_L-01_P-001" (solid, pour order 26): 31.008,49.116 30.988,49.136 30.988,61.658 32.123,62.794 32.123,67.34 32.078,67.386 37.628,67.386 37.628,49.914 38.166,49.375 39.192,49.375 39.192,48.278 39.037,48.433 30.996,48.433 30.996,49.104
-3.8V on Bottom Layer "-3.8V_L04_P036" (solid, remove dead copper, pour order 36): 24.74,67.427 29.766,67.427 29.711,44.704 24.74,44.704 24.74,54
GND on Bottom Layer "GND_L04_P055" (solid, remove dead copper, pour order 55): 68.58,68.58 68.58,1.143 1.143,1.143 1.27,1.27 1.27,68.58
2.2V on Bottom Layer "2.2V_L04_P029" (solid, remove dead copper, pour order 29): 64.072,46.419 66.802,46.419 66.802,53.721 46.101,53.721 44.933,54.889 44.933,62.575 44.958,62.6 44.958,67.401 40.005,67.401 40.005,62.6 39.497,62.092 39.497,50.165 39.624,50.038 57.277,50.038 57.404,50.165 57.404,46.99 57.975,46.419
+3.8V on Bottom Layer "+3.8V_L04_P033" (solid, remove dead copper, pour order 33): 31.008,49.116 39.188,49.116 39.37,22.225 32.766,22.225 32.766,42.926 30.988,42.926
GND on Bottom Layer "GND_L04_P044" (solid, remove dead copper, pour order 44): 42.672,18.923 39.497,15.748 35.306,15.748 35.055,15.497 33.655,15.497 33.655,21.59 34.036,21.971 39.37,21.971 39.355,21.986 39.355,31.775 42.647,31.775 42.672,31.75
VIN on Bottom Layer "VIN_L04_P043" (solid, remove dead copper, pour order 43): 15.621,34.163 15.621,8.89 33.782,8.89 34.671,8.001 35.052,8.001 35.052,13.081 36.576,14.605 36.576,15.113 36.322,15.367 19.304,15.367 18.288,16.383 18.288,22.987 18.379,23.078 22.581,23.078 22.733,23.23 22.733,34.163
VIN on Bottom Layer "VIN_L04_P042" (solid, remove dead copper, pour order 42): 34.508,12.446 35.814,15.494 39.751,15.494 42.926,18.669 42.926,31.498 45.396,31.498 45.466,31.429 45.466,27.305 49.276,23.495 61.087,23.495 62.992,25.4 62.992,31.242 61.54,32.694 61.54,34.874 63.428,34.874 64.516,33.786 66.294,30.861 66.294,23.114 62.484,23.114 61.468,22.098 61.468,13.081 60.833,12.446
GND on Bottom Layer "GND_L04_P040" (solid, remove dead copper, pour order 40): 31.75,42.672 33.02,42.672 33.02,27.051 31.75,27.051
VIN on Bottom Layer "VIN_L04_P038" (solid, remove dead copper, pour order 38): 22.506,30.977 22.479,31.004 22.479,34.163 27.813,34.163 27.813,39.116 32.004,39.116 32.004,31.369 27.851,31.369 27.459,30.977
GND on Bottom Layer "GND_L04_P037" (solid, pour order 37): 30.988,62.674 30.988,61.658 30.988,42.164 29.591,42.164 29.665,42.238 29.665,62.674
GND on Bottom Layer "GND_L04_P035" (solid, remove dead copper, pour order 35): 42.672,49.276 41.91,50.038 39.56,50.038 39.37,49.847 39.306,49.911 39.116,49.911 39.116,31.568 39.163,31.521 42.672,31.521
0.9V on Bottom Layer "0.9V_L04_P034" (solid, remove dead copper, pour order 34): 45.669,49.276 40.386,49.276 40.386,40.132 40.259,40.005 49.657,40.005 49.657,40.335 49.733,40.411
GND on Bottom Layer "GND_L04_P031" (solid, remove dead copper, pour order 31): 47.371,62.611 47.371,54.991 47.752,54.61 53.404,54.61 53.657,54.864 58.293,54.864 58.293,53.848 45.974,53.848 44.933,54.889 44.933,62.575 44.969,62.611
0.9V on Bottom Layer "0.9V_L04_P030" (solid, remove dead copper, pour order 30): 47.625,54.712 47.727,54.61 52.939,54.61 52.939,67.31 52.578,67.31 47.625,67.31
GND on Bottom Layer "GND_L04_P027" (solid, remove dead copper, pour order 27): 57.15,49.149 57.15,50.165 39.37,50.165 39.37,49.53 52.146,49.53 52.527,49.149
GND on Signal "NONET_L-01_P-001" (solid, remove dead copper, pour order 53): 1.27,68.58 68.58,68.58 68.58,1.143 1.143,1.143 1.27,1.27
GND on GND 1 "NONET_L-01_P-001" (solid, remove dead copper, pour order 54): 1.27,68.58 68.58,68.58 68.58,1.143 1.397,1.143 1.27,1.27

## Keep-outs
Bottom Layer:
  circle w0.254: c4,66 r2.5
  circle w0.254: c4,4 r2.5
  circle w0.254: c66,4 r2.5
  circle w0.254: c66,66 r2.5
Keep-Out Layer:
  lines w0.254: 1.27,1.143 68.58,1.143 68.58,68.58 1.27,68.58 1.27,1.143

## Other copper
Top Layer:
  rectangle net GND: 1.658,1.531 6.985,6.731
  rectangle net GND: 63.119,1.531 68.192,6.858
  rectangle net GND: 62.865,63.373 68.199,68.199
  rectangle net GND: 1.658,63.119 6.858,68.192
  rectangle net 2.2V: 57.071,40.047 60.998,42.565
  rectangle net GND: 64.389,33.807 68.199,39.624
  rectangle net GND: 52.324,42.951 57.26,50.317
  rectangle net 2.2V: 55.956,41.148 59.131,41.808
  rectangle net GND: 19.558,41.046 21.311,42.875
  rectangle net VIN: 21.871,23.002 27.586,30.937
  rectangle net +3.8V: 32.641,23.101 37.744,33.477
Bottom Layer:
  rectangle net GND: 37.728,1.524 39.624,7.239
  rectangle net GND: 45.339,1.778 48.006,7.493
  rectangle net GND: 26.289,2.286 28.956,8.001
  rectangle net NetD3_2: 23.241,2.413 25.908,8.128

## Silkscreen, mask and mechanical layers (free items; w line width, h text height)
Top Overlay:
  circle w0.254: c61.722,41.91 r0.41
  circle w0.254: c20.828,48.26 r0.41
  lines w0.254: 38.524,28.614 ccw(c38.176,28.397) 38.586,28.397 ; 45.995,8.466 46.503,7.958 47.011,8.466 45.995,8.466 ; 58.674,68.326 59.69,68.326 59.182,67.818 58.674,68.326
  text "GND" at 22.606,68.072 h1.02
  text "-3.8V" at 25.146,68.072 h1.02
  text "-3.8V" at 27.686,68.072 h1.02
  text "GND" at 30.226,68.072 h1.02
  text "3.8V" at 33.02,68.072 h1.02
  text "3.8V" at 35.306,68.072 h1.02
  text "GND" at 37.846,68.072 h1.02
  text "2.2V" at 40.386,68.072 h1.02
  text "2.2V" at 42.926,68.072 h1.02
  text "GND" at 45.466,68.072 h1.02
  text "0.9V" at 48.006,68.072 h1.02
  text "0.9V" at 50.546,68.072 h1.02
  text "GND" at 53.34,68.072 h1.02
  text "GND" at 55.88,68.072 h1.02
  text "GND" at 10.16,67.829 h1.02
  text "GND" at 13.462,67.829 h1.02
  text "29" at 19.506,66.228 h1.02
  text "1" at 61.417,66.218 h1.02
  text "Output" at 17.018,64.996 h1.27
  text "30" at 19.558,63.511 h1.02
  text "2" at 61.468,63.5 h1.02
  text "GND" at 3.048,62.992 h1.02
  text "GND" at 65.278,63.003 h1.02
  text "-3.8V" at 9.906,62.23 h1.02
  text "+3.8V" at 13.208,62.23 h1.02
  text "GND" at 23.125,61.976 h1.02 r270
  text "-3.8V" at 25.665,61.976 h1.02 r270
  text "-3.8V" at 28.205,61.976 h1.02 r270
  text "GND" at 30.745,61.976 h1.02 r270
  text "3.8V" at 33.285,61.976 h1.02 r270
  text "3.8V" at 35.825,61.976 h1.02 r270
  text "GND" at 38.365,61.976 h1.02 r270
  text "2.2V" at 41.148,61.977 h1.02 r270
  text "2.2V" at 43.434,61.977 h1.02 r270
  text "GND" at 45.985,61.976 h1.02 r270
  text "0.9V" at 48.525,61.976 h1.02 r270
  text "0.9V" at 51.065,61.976 h1.02 r270
  text "GND" at 53.605,61.976 h1.02 r270
  text "0.9V S-" at 56.388,61.976 h1.02 r270
  text "0.9V S+" at 58.685,61.976 h1.02 r270
  text "2.2V" at 63.246,60.198 h1.02 r90
  text "GND" at 68.823,60.198 h1.02 r90
  text "0.9V" at 63.246,56.896 h1.02 r90
  text "GND" at 68.823,56.896 h1.02 r90
  text "Mounting Holes are connected GND" at 3.048,46.736 h1.02 r90
  text "8045 (-3.8V)" at 14.224,46.736 h1.02
  text "4646 (0.9V. 2.2V)" at 51.308,28.702 h1.02
  text "L1" at 21.49,25.857 h1.02
  text "8033 (+3.8V)" at 39.37,25.654 h1.02
  text "VIN" at 61.468,24.638 h1.02
  text "GND" at 68.315,23.876 h1.02 r90
  text "Temp 2.2V" at 58.42,21.844 h1.02
  text "GND" at 68.315,21.082 h1.02 r90
  text "SW 2.2V" at 59.182,18.796 h1.02
  text "GND" at 68.315,18.034 h1.02 r90
  text "ClockOUT" at 58.674,15.748 h1.02
  text "GND" at 68.315,14.986 h1.02 r90
  text "G8" at 28.856,14.692 h1.02
  text "SW 0.9V" at 59.182,12.7 h1.02
  text "GND" at 68.315,11.938 h1.02 r90
  text "3/21 B#1006" at 3.923,9.779 h1.27 r90
  text "Mezzanine DCDC PCB R1" at 2.527,9.652 h1.27 r90
  text "Temp 0.9V" at 58.42,9.398 h1.02
  text "GND" at 45.466,8.901 h1.02
  text "GND" at 68.315,8.636 h1.02 r90
  text "2.2VPG" at 17.261,8.127 h1.02 r90
  text "3.8PG" at 19.801,8.128 h1.02 r90
  text "0.9V-EN" at 22.098,8.128 h1.02 r90
  text "0.9V-EN" at 34.036,8.139 h1.02
  text "GND" at 37.846,8.139 h1.02
  text "VIN" at 40.641,8.128 h1.02
  text "VIN" at 42.927,8.128 h1.02
  text "GND" at 26.257,8.11 h1.02
  text "VIN" at 23.902,7.823 h1.02
  text "5" at 14.986,6.615 h1.02
  text "1" at 28.702,6.604 h1.02
  text "9" at 33.528,6.107 h1.02
  text "1" at 49.53,6.096 h1.02
  text "Spare Input" at 9.906,5.588 h1.02
  text "10" at 14.986,3.821 h1.02
  text "6" at 28.702,3.821 h1.02
  text "GND" at 21.855,3.302 h1.02 r270
  text "10" at 33.147,3.313 h1.02
  text "2" at 49.529,3.302 h1.02
  text "0.9VPG" at 14.732,2.297 h1.02
  text "GND" at 26.416,2.297 h1.02
  text "VIN" at 23.862,2.266 h1.02
  text "M-EN" at 18.503,2.209 h1.02
  text "M-EN" at 34.798,1.524 h1.02
  text "GND" at 37.846,1.535 h1.02
  text "VIN" at 40.641,1.524 h1.02
  text "VIN" at 43.181,1.524 h1.02
  text "GND" at 45.466,1.535 h1.02
  text "GND" at 2.794,1.27 h1.02
  text "GND" at 65.278,1.27 h1.02
Bottom Overlay:
  circle w0.254: c28.956,11.176 r0.41
  text "GND" at 11.938,68.337 h1.02
  text "GND" at 15.24,68.337 h1.02
  text "GND" at 24.13,67.575 h1.02
  text "-3.8V" at 26.924,67.575 h1.02
  text "-3.8V" at 29.464,67.575 h1.02
  text "GND" at 32.004,67.575 h1.02
  text "3.8V" at 34.544,67.575 h1.02
  text "3.8V" at 37.084,67.575 h1.02
  text "GND" at 39.624,67.575 h1.02
  text "2.2V" at 42.165,67.564 h1.02
  text "2.2V" at 44.451,67.564 h1.02
  text "GND" at 47.244,67.575 h1.02
  text "0.9V" at 49.784,67.575 h1.02
  text "0.9V" at 52.07,67.575 h1.02
  text "GND" at 54.864,67.575 h1.02
  text "29" at 21.591,66.051 h1.02
  text "1" at 60.96,66.04 h1.02
  text "Output" at 19.812,64.742 h1.27
  text "30" at 21.59,63.511 h1.02
  text "2" at 61.215,63.246 h1.02
  text "GND" at 5.08,63.003 h1.02
  text "GND" at 67.31,63.003 h1.02
  text "-3.8V" at 11.673,62.484 h1.02 r90
  text "+3.8V" at 14.721,62.484 h1.02 r90
  text "GND" at 69.331,62.23 h1.02 r90
  text "GND" at 23.611,61.976 h1.02 r90
  text "-3.8V" at 26.151,61.976 h1.02 r90
  text "-3.8V" at 28.691,61.976 h1.02 r90
  text "GND" at 31.485,61.976 h1.02 r90
  text "0.9V S-" at 56.885,61.976 h1.02 r90
  text "0.9V S+" at 59.425,61.976 h1.02 r90
  text "3.8V" at 34.025,61.722 h1.02 r90
  text "3.8V" at 36.565,61.722 h1.02 r90
  text "GND" at 39.105,61.722 h1.02 r90
  text "2.2V" at 41.402,61.723 h1.02 r90
  text "2.2V" at 44.196,61.723 h1.02 r90
  text "GND" at 46.725,61.722 h1.02 r90
  text "0.9V" at 49.265,61.722 h1.02 r90
  text "0.9V" at 51.805,61.722 h1.02 r90
  text "GND" at 54.345,61.722 h1.02 r90
  text "2.2V" at 62.738,61.214 h1.02 r90
  text "No remote sense, R19, R20 = 0 ohm jumper" at 5.512,61.156 h1.02 r90
  text "Use remote sense, R19, R20 = open" at 4.409,61.117 h1.02 r90
  text "Mounting Holes are connected GND" at 3.048,60.96 h1.02 r90
  text "GND" at 69.331,58.928 h1.02 r90
  text "0.9V" at 62.738,57.912 h1.02 r90
  text "8045 (-3.8V)" at 25.908,46.99 h1.02
  text "4646 (0.9V. 2.2V)" at 47.498,44.704 h1.02
  text "VIN" at 62.249,24.5 h1.02
  text "GND" at 68.261,23.75 h1.02 r270
  text "Mezzanine DCDC PCB R1" at 2.654,22.733 h1.27 r90
  text "2.2V" at 62.251,22 h1.02
  text "T2" at 62.25,21 h1.02
  text "GND" at 68.261,21 h1.02 r270
  text "2.2V" at 62.251,18.75 h1.02
  text "GND" at 68.261,18 h1.02 r270
  text "SW" at 62.25,17.761 h1.02
  text "3/21 B#1006" at 3.923,16.002 h1.27 r90
  text "CLK" at 62.21,15.761 h1.02
  text "GND" at 68.221,15 h1.02 r270
  text "8033 (+3.8V)" at 34.29,14.732 h1.02
  text "0.9V" at 62.25,13.011 h1.02
  text "SW" at 62.25,12.011 h1.02
  text "GND" at 68.261,12 h1.02 r270
  text "0.9V" at 62.21,9.511 h1.02
  text "GND" at 68.221,8.75 h1.02 r270
  text "T1" at 62.23,8.382 h1.02
  text "GND" at 47.327,7.65 h1.02
  text "0.9V-EN" at 37.338,7.631 h1.02
  text "GND" at 39.624,7.631 h1.02
  text "VIN" at 41.909,7.62 h1.02
  text "VIN" at 44.549,7.572 h1.02
  text "9" at 34.95,6.132 h1.02
  text "1" at 48.26,6.096 h1.02
  text "Power On" at 62.433,5.55 h1.27
  text "10" at 35.23,4.303 h1.02
  text "2" at 48.261,3.556 h1.02
  text "GND" at 47.581,1.808 h1.02
  text "M-EN" at 37.084,1.778 h1.02
  text "GND" at 39.878,1.789 h1.02
  text "VIN" at 44.449,1.778 h1.02
  text "VIN" at 42.009,1.73 h1.02
  text "GND" at 4.826,1.281 h1.02
  text "GND" at 67.31,1.281 h1.02
Mechanical 1:
  the board outline again, w0.254
Top Assembly:
  lines w0.381: 29.007,82.575 29.007,118.618 ; 29.134,86.131 118.161,86.131 ; 29.21,98.069 118.097,98.069 ; 54.915,167.716 117.78,167.716 ; 54.915,171.526 117.78,171.526 ; 60.63,164.541 60.63,171.526 ; 63.15,86.131 63.15,98.044 ; 66.345,164.541 66.345,171.526 ; 83.724,86.131 83.724,98.044 ; 91.745,86.131 91.745,98.044 ; 91.745,164.541 91.745,171.526 ; 102.921,82.321 102.921,86.131 ; 106.35,164.541 106.35,171.526
  lines w0.635: 28.956,82.169 118.415,82.169 118.415,176.276 28.956,176.276 ; 29.21,176.276 29.21,82.575 29.007,82.575 29.007,82.321 118.161,82.321 118.161,118.618 ; 54.915,175.336 54.915,164.16 117.78,164.16
  text "REVISION HISTORY" at 75.235,172.161 h1.52
  text "ECO" at 56.185,168.986 h1.27
  text "REV" at 61.9,168.986 h1.27
  text "DESCRIPTION" at 73.33,168.986 h1.27
  text "ENG" at 94.285,168.986 h1.27
  text "DATE" at 109.525,168.986 h1.27
  text "-" at 57.455,165.176 h1.27
  text "1" at 63.195,165.125 h1.27
  text "PROTOTYPE" at 70.815,165.125 h1.27
  text "J. JUNEAU" at 94.31,165.125 h1.27
  text "03-12-2021" at 106.426,165.1 h1.27
  text "NOTES: UNLESS OTHERWISE SPECIFIED" at 38.608,147.066 h2.03
  text "1. WORKMANSHIP SHALL BE IN ACCORDANCE WITH IPC-A-610." at 38.989,143.205 h1.27
  text "MAXIMUM SOLDER TEMPERATURE IS 240 DEGREES CELSIUS." at 41.529,136.855 h1.27
  text "3. PARTS TO OMIT WILL BE SPECIFIED ON THE BILL OF MATERIALS." at 37.973,133.045 h1.27
  text "LOCATIONS OF OMITTED PARTS SHALL BE FREE OF SOLDER." at 41.148,130.505 h1.27
  text "MASK THE SOLDER STENCIL WHERE SMT PARTS ARE OMITTED." at 41.148,127.965 h1.27
  text "TITLE:" at 31.039,92.953 h1.27
  text "ASSEMBLY DRAWING" at 38.659,92.953 h1.27
  text "REV" at 84.836,92.71 h1.27
  text "Board Number:" at 64.77,91.186 h1.27
  text "1006" at 78.486,91.186 h1.27
  text "1" at 86.106,89.827 h1.65
  text "SUPER-FGD MEZZANINE DCDC PCB" at 31.315,89.789 h1.27
  text "MezzanineDCDC_R1.PCB" at 73.33,83.464 h1.27
  text "FILENAME:" at 58.979,83.337 h1.27
  text "SHT 1 OF 1" at 104.191,83.337 h1.27
Drill Drawing:
  circle w0.254: c217.932,10.414 r0.847
  lines w0.152: 131.282,121.273 136.362,126.404 159.298,126.404 ; 131.332,93.409 134.253,93.409 ; 131.383,117.895 134.304,117.895 ; 135.32,93.384 138.241,93.384 ; 135.447,113.704 138.368,113.704 ; 136.068,129.057 170.358,129.057 ; 136.068,129.692 170.358,129.692 ; 139.41,113.653 143.22,117.514 159.171,117.514 ; 139.46,108.446 142.585,108.446 ; 139.511,93.409 142.635,93.409 ; 143.905,108.624 148.477,113.196 159.171,113.196 ; 159.171,122.086 139.41,122.086 135.346,117.971 ; 135.346,117.971 137.53,119.368 136.641,120.257 135.346,117.971 ; 131.332,121.299 133.517,122.696 132.628,123.585 131.332,121.299 ; 139.435,113.704 141.619,115.101 140.73,115.99 139.435,113.704 ; 143.778,108.497 145.963,109.894 145.074,110.783 143.778,108.497
  lines w0.254: 112.293,82.906 182.016,82.906 ; 112.293,83.541 182.016,83.541 ; 217.085,5.757 218.779,5.757 218.779,7.451 217.085,7.451 217.085,5.757 ; 217.085,13.377 217.085,13.801 217.509,14.224 217.085,14.647 217.085,15.071 217.509,15.071 217.932,14.647 218.355,15.071 218.779,15.071 218.779,14.647 218.355,14.224 218.779,13.801 218.779,13.377 218.355,13.377 217.932,13.801 217.509,13.377 217.085,13.377 ; 217.085,17.187 217.932,17.611 218.779,17.187 218.355,18.034 218.779,18.881 217.932,18.457 217.085,18.881 217.509,18.034 217.085,17.187 ; 217.085,21.421 217.509,21.421 217.932,20.997 218.355,21.421 218.779,21.421 218.355,21.844 218.779,22.267 218.355,22.267 217.932,22.691 217.509,22.267 217.085,22.267 217.509,21.844 217.085,21.421
  lines w0.305: 130.215,92.012 131.332,92.012 131.332,123.051 130.215,123.051 130.215,92.012 ; 134.279,92.012 135.396,92.012 135.396,118.987 134.279,118.987 134.279,92.012 ; 138.343,92.012 139.46,92.012 139.46,114.669 138.343,114.669 138.343,92.012 ; 142.661,92.012 143.778,92.012 143.778,109.589 142.661,109.589 142.661,92.012
  lines w0.381: 107.798,5.512 196.825,5.512 ; 107.874,17.45 196.761,17.45 ; 134.087,143.739 196.952,143.739 ; 134.087,147.549 196.952,147.549 ; 139.802,140.564 139.802,147.549 ; 141.814,5.512 141.814,17.424 ; 145.517,140.564 145.517,147.549 ; 162.388,5.512 162.388,17.424 ; 170.409,5.512 170.409,17.424 ; 170.917,140.564 170.917,147.549 ; 181.585,1.702 181.585,5.512 ; 185.522,140.564 185.522,147.549 ; 215.567,4.614 502.862,4.614 ; 215.567,23.664 502.862,23.664 ; 229.559,0.804 229.559,27.474 ; 244.795,0.804 244.795,27.474 ; 273.742,0.804 273.742,27.474 ; 286.592,0.804 286.592,27.474 ; 305.23,0.804 305.23,27.474 ; 343.319,0.804 343.319,27.474 ; 358.301,0.804 358.301,27.474 ; 377.244,0.804 377.244,27.474 ; 412.286,0.804 412.286,27.474 ; 433.971,0.804 433.971,27.474 ; 467.845,0.804 467.845,27.474 ; 215.567,0.804 502.862,0.804 502.862,27.474 215.567,27.474 215.567,0.804
  lines w0.635: 107.112,151.613 197.079,151.613 ; 107.315,1.829 107.315,39.287 107.315,114.205 107.315,151.663 ; 107.484,1.662 197.45,1.662 ; 134.087,151.359 134.087,140.183 196.952,140.183 ; 196.825,1.448 196.825,37.998 ; 197.079,1.549 197.079,151.536
  text "REVISION HISTORY" at 154.407,148.184 h1.52
  text "ECO" at 135.357,145.009 h1.27
  text "REV" at 141.072,145.009 h1.27
  text "DESCRIPTION" at 152.502,145.009 h1.27
  text "ENG" at 173.457,145.009 h1.27
  text "DATE" at 188.697,145.009 h1.27
  text "-" at 136.627,141.199 h1.27
  text "1" at 142.367,141.148 h1.27
  text "PROTOTYPE" at 149.987,141.148 h1.27
  text "J. JUNEAU" at 173.482,141.148 h1.27
  text "03-12-2021" at 185.598,141.122 h1.27
  text "LAYER STRUCTURE" at 136.703,130.962 h2.16
  text "L1 - TOP SIDE" at 160.568,125.54 h1.27
  text "L2 - GND" at 160.568,121.222 h1.27
  text "L3 - SIGNALS" at 160.568,116.65 h1.27
  text "L4 - BOTTOM SIDE" at 160.568,112.078 h1.27
  text "NOTES: UNLESS OTHERWISE SPECIFIED" at 112.293,84.811 h2.16
  text "1. FAB PER IPC-A-600." at 112.928,79.096 h1.27
  text "2. MATERIAL: -LEAD FREE ASSEMBLY COMPLIANT, FR-4" at 112.293,75.286 h1.27
  text "OR EQUIVALENT." at 129.311,72.746 h1.27
  text "-FINISHED THICKNESS TO BE 0.062 +/- 10%" at 127.406,69.571 h1.27
  text "-TOTAL OF 4 LAYERS WITH 2 OZ. CU ON ALL LAYERS" at 127.406,66.396 h1.27
  text "3. SIZE: CUT TO DIMENSIONS AND TOLERANCES SHOWN." at 112.166,59.411 h1.27
  text "4. FINISH: -SMOBC USING LPI BOTH SIDES, COLOR GREEN." at 112.166,53.95 h1.27
  text "-GOLD IMMERSION BOTH SIDES." at 123.596,50.775 h1.27
  text "-FOR SILKSCREENS: USE WHITE NON-CONDUCTIVE INK." at 123.596,47.6 h1.27
  text "5. PCBS ARE TO BE RoHS COMPLIANT." at 112.141,41.529 h1.27
  text "6. ALL VIAS ARE FILLED, PLATED AND TENTED." at 112.359,36.99 h1.27
  text "7. ENIG" at 112.014,32.893 h1.27
  text "8. 2 OZ COPPER ON ALL LAYERS" at 112.09,29.261 h1.27
  text "Symbol" at 217.853,24.807 h1.83
  text "Count" at 230.702,24.807 h1.83
  text "Hole Size" at 245.938,24.807 h1.83
  text "Plated" at 274.885,24.807 h1.83
  text "Hole Type" at 287.735,24.807 h1.83
  text "Drill Layer Pair" at 306.373,24.807 h1.83
  text "Via/Pad" at 344.462,24.807 h1.83
  text "Pad Shape" at 359.444,24.807 h1.83
  text "Template" at 378.387,24.807 h1.83
  text "Description" at 413.429,24.807 h1.83
  text "Hole Tolerance (+)" at 435.114,24.807 h1.83
  text "Hole Tolerance (-)" at 468.988,24.807 h1.83
  text "4" at 230.702,20.997 h1.52
  text "110.24mil (2.800mm)" at 245.938,20.997 h1.52
  text "PTH" at 274.885,20.997 h1.52
  text "Round" at 287.735,20.997 h1.52
  text "Top Layer - Bottom Layer" at 306.373,20.997 h1.52
  text "Pad" at 344.462,20.997 h1.52
  text "Rounded" at 359.444,20.997 h1.52
  text "c381h280_2670034071" at 378.387,20.997 h1.52
  text "10" at 230.702,17.187 h1.52
  text "42.00mil (1.067mm)" at 245.938,17.187 h1.52
  text "PTH" at 274.885,17.187 h1.52
  text "Round" at 287.735,17.187 h1.52
  text "Top Layer - Bottom Layer" at 306.373,17.187 h1.52
  text "Pad" at 344.462,17.187 h1.52
  text "(Mixed)" at 359.444,17.187 h1.52
  text "(Mixed)" at 378.387,17.187 h1.52
  text "30" at 230.702,13.377 h1.52
  text "40.00mil (1.016mm)" at 245.938,13.377 h1.52
  text "PTH" at 274.885,13.377 h1.52
  text "Round" at 287.735,13.377 h1.52
  text "Top Layer - Bottom Layer" at 306.373,13.377 h1.52
  text "Pad" at 344.462,13.377 h1.52
  text "(Mixed)" at 359.444,13.377 h1.52
  text "(Mixed)" at 378.387,13.377 h1.52
  text "TITLE:" at 109.703,12.334 h1.27
  text "FABRICATION DRAWING" at 117.323,12.334 h1.27
  text "REV" at 163.5,12.09 h1.27
  text "Board Number:" at 143.434,10.566 h1.27
  text "1006" at 157.15,10.566 h1.27
  text "30" at 230.702,9.567 h1.52
  text "41.73mil (1.060mm)" at 245.938,9.567 h1.52
  text "PTH" at 274.885,9.567 h1.52
  text "Round" at 287.735,9.567 h1.52
  text "Top Layer - Bottom Layer" at 306.373,9.567 h1.52
  text "Pad" at 344.462,9.567 h1.52
  text "(Mixed)" at 359.444,9.567 h1.52
  text "(Mixed)" at 378.387,9.567 h1.52
  text "1" at 164.77,9.207 h1.65
  text "SUPER-FGD MEZZANINE DCDC PCB" at 109.979,9.169 h1.27
  text "382" at 230.702,5.757 h1.52
  text "10.00mil (0.254mm)" at 245.938,5.757 h1.52
  text "PTH" at 274.885,5.757 h1.52
  text "Round" at 287.735,5.757 h1.52
  text "Top Layer - Bottom Layer" at 306.373,5.757 h1.52
  text "Via" at 344.462,5.757 h1.52
  text "Rounded" at 359.444,5.757 h1.52
  text "v51h25m0mx0_2670034071" at 378.387,5.757 h1.52
  text "MezzanineDCDC_R1.PCB" at 151.994,2.845 h1.27
  text "FILENAME:" at 137.643,2.718 h1.27
  text "SHT 1 OF 1" at 182.855,2.718 h1.27
  text "456 Total" at 230.702,1.947 h1.52

## Text inside footprints (layer, text, board x,y; h text height)
U1: Top Overlay "L1" at 46.812,43.993 h1.02 r270; Top Overlay "A1" at 60.706,42.926 h1.02; Top Overlay "L8" at 44.958,32.766 h1.02 r270; Mechanical 16 "11.25 (mm)" at 63.703,40.411 h0.76 r270; Mechanical 16 "15 (mm)" at 49.607,27.324 h1.27; Mechanical 16 "1.27 (mm)" at 40.336,45.892 h1.27 r270
U2: Top Overlay "A1" at 36.501,28.981 h1.02 r270; Top Overlay "L8" at 23.114,17.526 h1.02 r270; Mechanical 15 "11.25 (mm)" at 40.074,25.768 h0.9 r270; Mechanical 15 "15 (mm)" at 26.546,12.965 h1.27; Mechanical 15 "1.27 (mm)" at 17.513,30.652 h1.27 r270
U3: Top Overlay "H5" at 28.042,35.24 h1.02; Top Overlay "A1" at 20.066,46.482 h1.02; Mechanical 15 "6.25 (mm)" at 23.234,50.029 h0.4; Mechanical 15 "11.25 (mm)" at 31.903,38.037 h0.9 r90; Mechanical 15 "1.27 (mm)" at 17.862,31.634 h1.27